# Altium PCB BOARD_4LAYER.PcbDoc (part 12 of 21)
Units mil, origin at the board's own origin, x right, y up, seen from the top; angles counter-clockwise.
Board outline 6692.91 x 10039.37 mil, 4 copper layers (Top Layer, Mid Layer 1, Mid Layer 2, Bottom Layer), stack 66.299 mil thick; 1532 components, 908 nets, 4105 pads, 1286 vias.
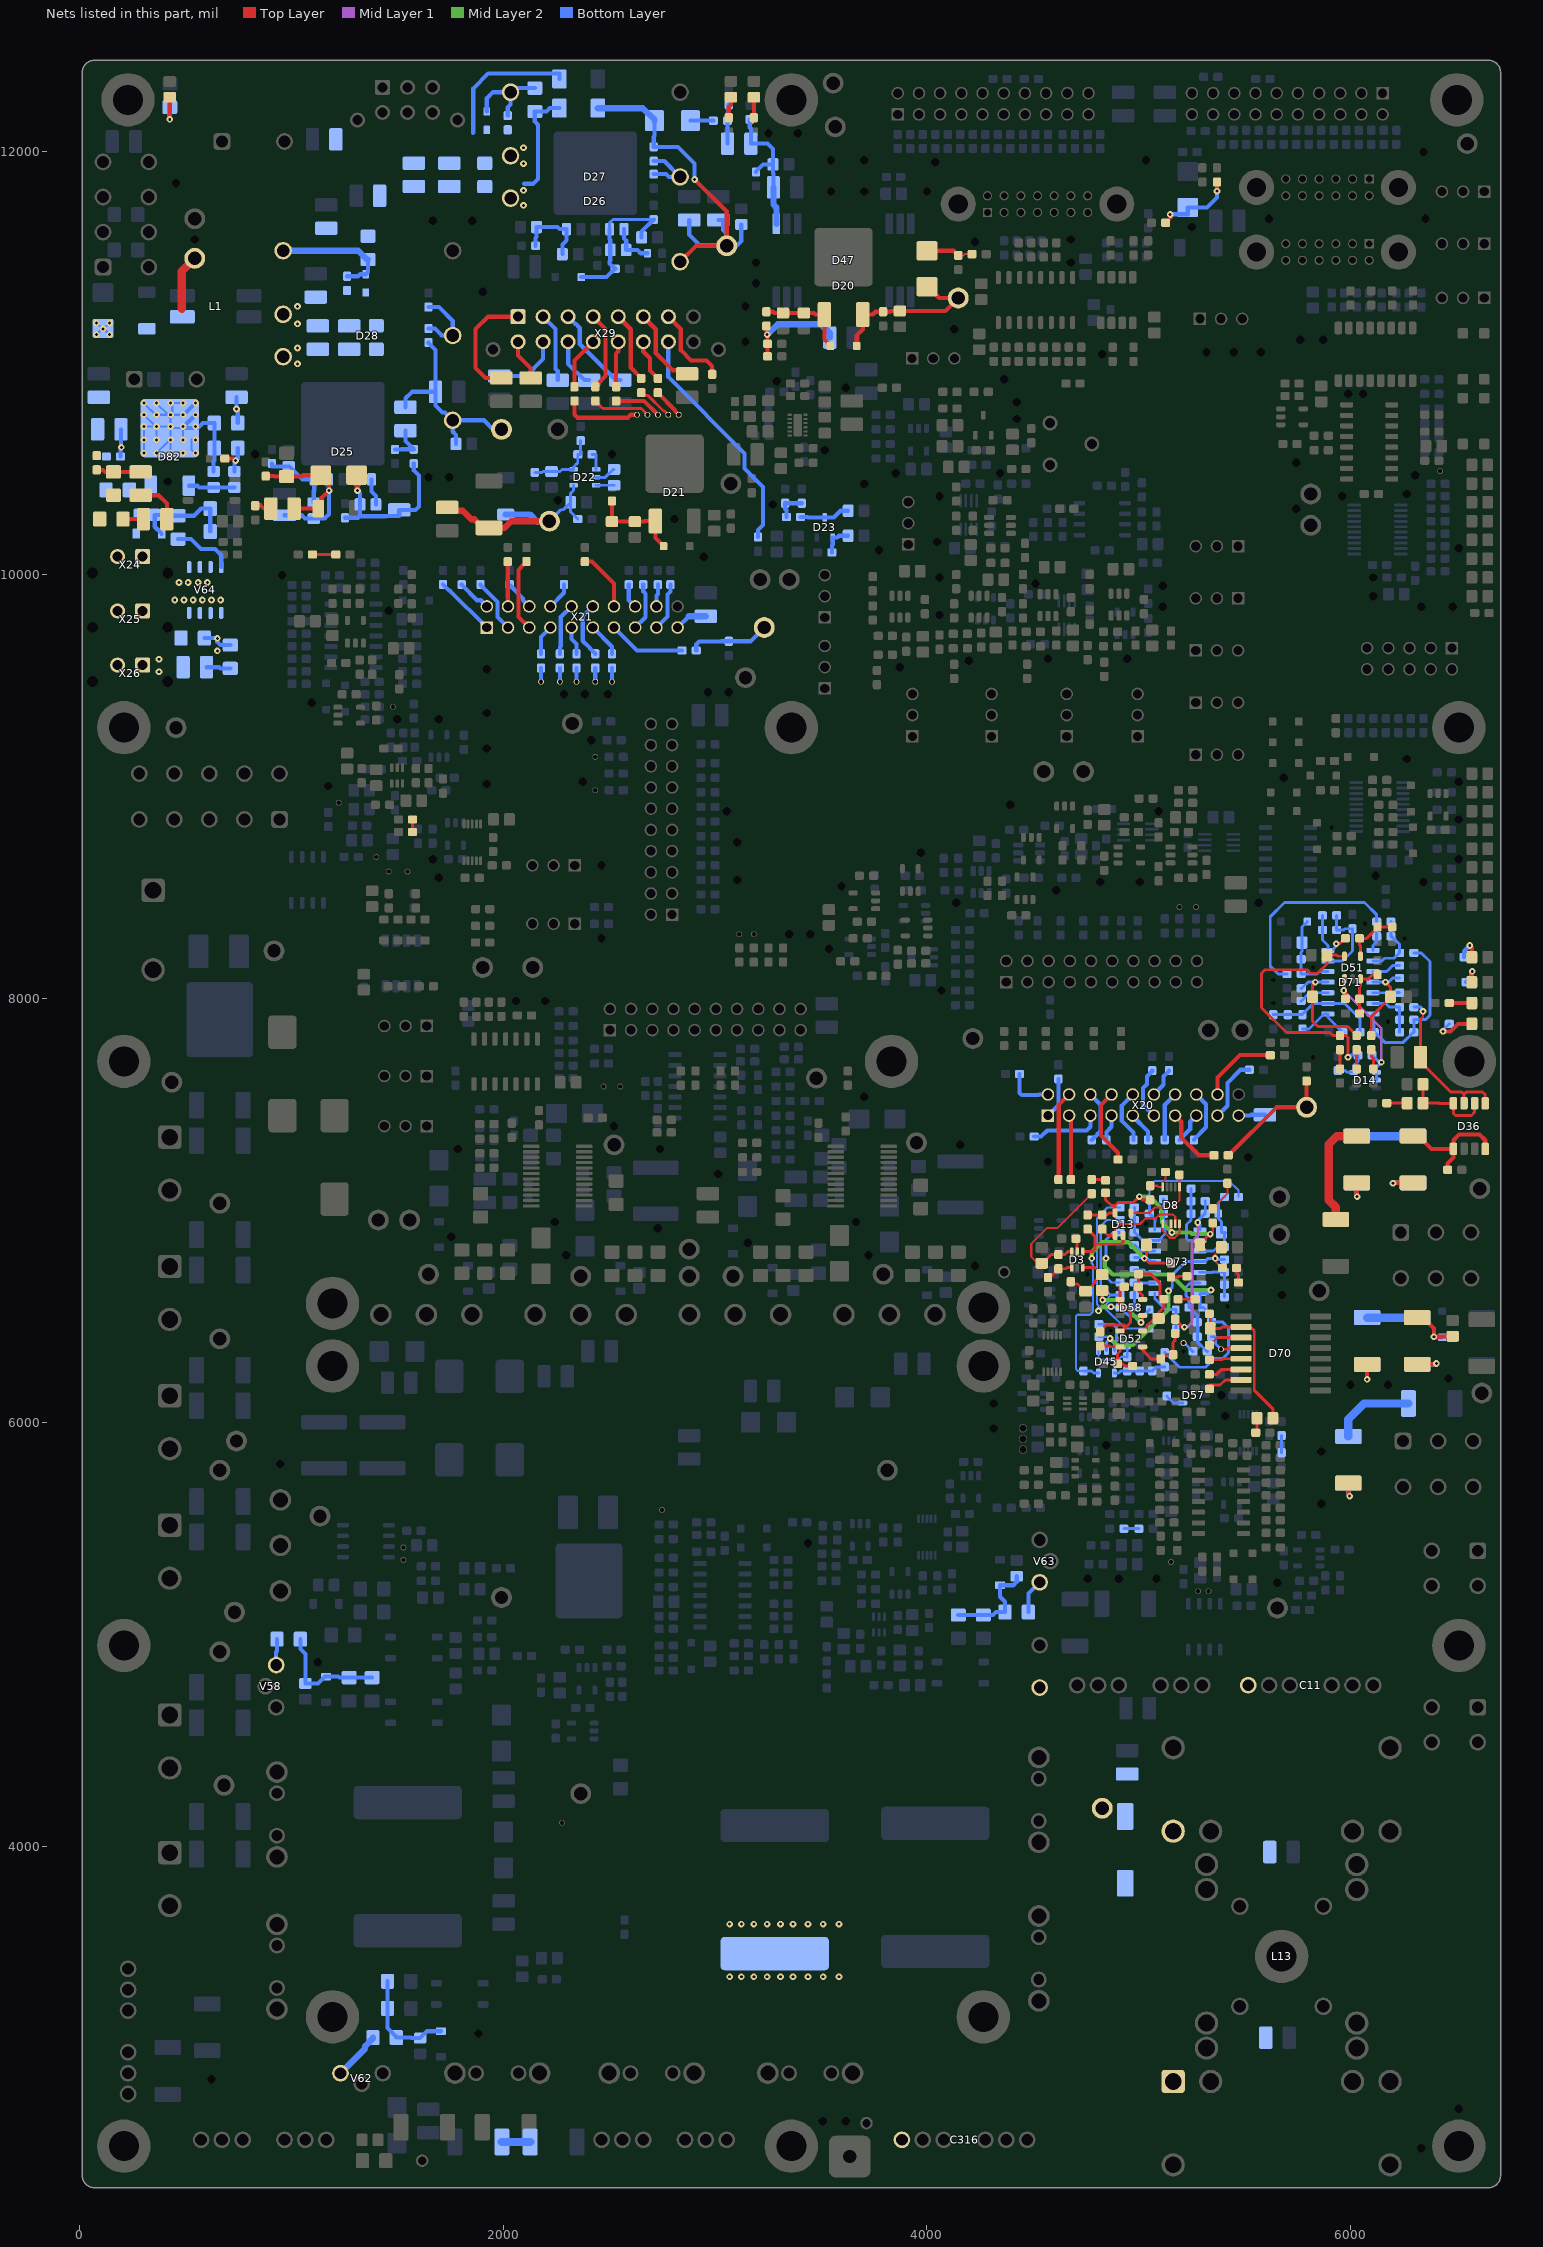
[diagram p14: the nets of this part, all layers, seen from the top]

## Via types
v1: diameter 27.56/31.5/31.5/27.56 (per signal layer), hole 13.78, Top Layer to Bottom Layer, 1270 vias
v2: diameter 59.06, hole 39.37, Top Layer to Bottom Layer, 16 vias

## Nets (pads, with @x,y where several pads share a name; then routed paths per layer and width w, separated by ;. In a path a pad name is that pad's centre, name@x,y a point inside that pad or via, vN(x,y) a via of type N, cw(c..) or ccw(c..) an arc to the next point about the centre after c; other vN are vias at no path point) (continued)
$3N6843: FB10.1 R187.1 | length 80.7
  Bottom Layer w13.78: R187.1@5673.23,5858.27 FB10.1@5673.23,5938.98
$3N6847: FB4.1 R186.1 | length 59.1
  Top Layer w13.78: R186.1@1572.83,8787.4 FB4.1@1572.83,8846.46
$3N6925: D57.4 R68.2 | length 89.8
  Bottom Layer w13.78: R68.2@5131.89,6125.98 5131.89,6124.02 5163.39,6092.52 D57.4@5206.69,6092.52
$3N7024: FB13.2 R184.2 | length 70.9
  Bottom Layer w13.78: FB13.2@4929.13,5500 R184.2@5000,5500
$3N7036: FB7.2 R180.2 | length 110.2
  Top Layer w13.78: R180.2@1100.39,10096.46 FB7.2@1210.63,10096.46
$4N2765: D27.4 R527.1 R561.2 | length 285.5
  Bottom Layer w19.68: R561.2@2710.63,11891.73 2769.02,11891.73 2782.8,11877.95 D27.4@2835.04,11877.95 2760.24,11952.76 R527.1@2710.63,11952.76
$4N2766: H17.1 R576.2 | length 161.4
  Top Layer w19.68: v1(427.17,12149.61) H17.1@427.17,12253.94
  Bottom Layer w19.68: v1(427.17,12149.61) R576.2@427.17,12206.69
$4N2767: D27.6 R526.2 R574.1 V22.1 | length 424.7
  Bottom Layer w19.68: V22.1@1923.23,12187.01 1923.23,12249.28 1951.9,12277.95 D27.6@2035.04,12277.95 ; R526.2@2021.65,12167.32 2021.65,12206.1 2035.04,12219.49 D27.6@2035.04,12277.95 ; R574.1@2149.61,12297.24 2054.33,12297.24 D27.6@2035.04,12277.95
$4N2769: C117.2 C175.1 D20.1 FB61.2 V11.1 | length 438.8
  Top Layer w19.68: FB61.2@3242.13,11242.13 3273.62,11242.13 3279.53,11236.22 C117.2@3320.87,11236.22 C175.1@3419.29,11236.22 3465.47,11236.22 3473.35,11228.35 D20.1@3515.75,11228.35 3515.75,11110.24 3544.29,11081.69 V11.1@3544.29,11080.71
$4N2770: C37.2 C118.2 C259.2 D47.1 L3.2 R267.2 | length 686.8
  Bottom Layer w19.68: R267.2@3163.39,12149.61 3163.39,12111.22 3169.29,12105.32 L3.2@3169.29,12035.43 3247.4,12035.43 3273.62,12009.21 C118.2@3273.62,11937.01 ; C37.2@3192.91,11901.57 3192.91,11903.54 3226.38,11937.01 C118.2@3273.62,11937.01 ; C259.2@3275.59,11828.74 3275.59,11893.7 3273.62,11895.67 C118.2@3273.62,11937.01
  Bottom Layer w29.53: C259.2@3275.59,11828.74 3275.59,11748.23 3289.76,11734.06 D47.1@3289.76,11657.48
$4N2771: C35.2 FB61.1 L5.2 R268.2 | length 505.9
  Top Layer w19.68: FB61.1@3242.13,11175.2 3242.13,11142.64 v1@3246.06,11138.7 ; v1(3246.06,11133.86) v1@3246.06,11138.7 ; R268.2@3248.03,11031.5 C35.2@3248.03,11090.55 3248.03,11136.73 v1@3246.06,11138.7
  Bottom Layer w29.53: v1(3246.06,11133.86) 3295.8,11183.59 3499.48,11183.59 3541.34,11141.73 L5.2@3541.34,11120.08
$4N2773: D22.4 R266.1 | length 90.6
  Bottom Layer w13.78: R266.1@2419.29,10568.9 2438.98,10568.9 D22.4@2438.98,10498.03
$4N2774: C263.2 D22.5 | length 100.1
  Bottom Layer w13.78: D22.5@2438.98,10460.63 2482.28,10460.63 2519.69,10498.03 C263.2@2523.62,10498.03
$4N2775: C263.1 D22.6 | length 84.6
  Bottom Layer w13.78: D22.6@2438.98,10423.23 C263.1@2523.62,10423.23
$4N2778: C42.2 FB64.2 V27.1 | length 399.8
  Top Layer w13.78: FB64.2@5125.98,11661.42 5127.95,11661.42 5153.04,11686.51 5153.04,11695.38 v1(5147.64,11700.79)
  Top Layer w19.68: v1(5368.11,11811.02) C42.2@5368.11,11854.33
  Bottom Layer w19.68: v1(5147.64,11700.79) 5148.61,11701.76 5230.31,11701.76 V27.1@5230.31,11734.25 5321,11734.25 5368.11,11781.36 v1(5368.11,11811.02)
$4N2780: C44.2 FB63.1 V26.1 | length 224
  Top Layer w10: C44.2@4147.64,11507.87 4172.32,11507.87 4178.23,11513.78 FB63.1@4212.6,11513.78
  Top Layer w19.68: V26.1@4000,11529.53 4125.98,11529.53 C44.2@4147.64,11507.87
$4N2782: C38.2 C116.2 D20.3 TP19.1 V11.2 V26.2 | length 813.3
  Top Layer w19.68: V11.2@3668.31,11080.71 3668.31,11129.84 3696.85,11158.39 D20.3@3696.85,11228.35 3744.09,11228.35 3757.87,11242.13 C38.2@3793.31,11242.13 3825.79,11242.13 3829.72,11246.06 C116.2@3872.05,11246.06 4086.61,11246.06 TP19.1@4147.64,11307.09 4070.84,11307.09 4069.88,11306.13 4058.04,11306.13 4003.94,11360.24 V26.2@4000,11360.24
$4N2786: C180.1 D23.1 R188.2 | length 148.6
  Bottom Layer w19.68: R188.2@3551.18,10106.3 3551.18,10139.76 3555.12,10143.7 D23.1@3555.12,10177.17 3576.85,10177.17 3584.72,10185.04 C180.1@3627.95,10185.04
$4N2787: C120.2 D23.3 R189.1 | length 238.3
  Bottom Layer w19.68: R189.1@3403.54,10273.62 3436.1,10273.62 3438.07,10271.65 D23.3@3517.72,10271.65 3559.96,10271.65 3591.46,10303.15 C120.2@3627.95,10303.15
$4N2788: C45.2 FB18.1 R189.2 | length 146.1
  Bottom Layer w19.68: R189.2@3336.61,10273.62 3336.61,10306.02 3330.71,10311.93 FB18.1@3330.71,10338.58 C45.2@3409.45,10338.58
$4N2791: C40.2 C177.1 D22.1 R728.1 R729.2 TP20.1 V31.2 | length 1080.4
  Top Layer w29.53: R728.1@1736.22,10318.9 1736.22,10303.11 1809.69,10303.11 1849.52,10263.28 1864.67,10263.28 1905.51,10222.44 R729.2@1933.07,10222.44 2006.97,10222.44 2038.46,10253.94 TP20.1@2218.5,10253.94
  Bottom Layer w13.78: TP20.1@2218.5,10253.94 2272.15,10307.59 2283.96,10307.59 C177.1@2318.9,10342.52 ; D22.1@2332.68,10423.23 2332.68,10399.11 2318.9,10385.33 C177.1@2318.9,10342.52 ; C40.2@2352.36,10263.78 2318.9,10297.24 C177.1@2318.9,10342.52
  Bottom Layer w29.53: V31.2@2011.81,10285.43 2126.89,10285.43 2158.39,10253.94 TP20.1@2218.5,10253.94
$4N2792: C39.2 C176.1 D22.3 FB62.2 R266.2 | length 346.1
  Bottom Layer w13.78: C39.2@2149.61,10484.25 2183.98,10484.25 2187.91,10488.19 C176.1@2228.35,10488.19 2268.78,10488.19 2278.62,10498.03 D22.3@2332.68,10498.03 2332.68,10509.94 2352.36,10529.62 R266.2@2352.36,10568.9 2365.36,10568.9 2365.36,10600.51 2366.14,10601.3 FB62.2@2366.14,10633.86
$4N2798: C272.2 D25.5 R571.1 R572.2 | length 349.5
  Bottom Layer w19.68: C272.2@909.45,10525.59 909.45,10511.81 R572.2@988.19,10511.81 992.13,10511.81 1053.15,10450.79 D25.5@1108.66,10450.79 1108.66,10398.03 1106.3,10395.67 R571.1@1106.3,10340.55
$4N2801: D25.1 R569.1 | length 126.4
  Bottom Layer w19.68: D25.1@1379.53,10450.79 1379.53,10393.19 1399.61,10373.11 R569.1@1399.61,10332.68
$4N2802: FB72.1 R548.1 | length 80.1
  Top Layer w19.68: FB72.1@830.71,10326.77 832.58,10328.65 856.01,10328.65 871.66,10312.99 R548.1@903.54,10312.99
$4N2803: C52.2 C310.1 D25.4 R548.2 R568.2 R571.2 V40.2 V41.1 | length 996.7
  Top Layer w19.68: C52.2@879.92,10466.54 920.28,10466.54 922.24,10464.57 R568.2@978.35,10464.57 1049.21,10464.57 1055.12,10470.47 V40.2@1139.76,10470.47 1178.03,10470.47 1178.03,10398.75 v1(1179.13,10397.64) 1161.68,10380.18 1159.65,10380.18 1144.7,10365.24 1144.7,10312.99 V41.1@1127.95,10312.99 R548.2@1013.78,10312.99
  Bottom Layer w19.68: C310.1@968.5,10281.5 1050.12,10281.5 1065.87,10265.75 R571.2@1106.3,10265.75 1158.18,10265.75 1179.13,10286.7 v1(1179.13,10397.64) 1176.38,10400.39 D25.4@1176.38,10450.79
$4N2804: D28.4 R529.1 R562.2 | length 339.9
  Bottom Layer w19.68: R529.1@1647.64,11163.39 1678.23,11163.39 1709.96,11131.65 1709.96,11129.92 D28.4@1762.2,11129.92 1762.2,11198.98 1697.41,11263.78 R562.2@1647.64,11263.78
$4N2805: D28.6 R528.2 R575.1 V23.1 | length 582.9
  Bottom Layer w19.68: R528.2@1263.78,11409.45 1315.87,11409.45 1325.71,11419.29 V23.1@1352.36,11419.29 1362.2,11429.13 R575.1@1362.2,11488.19
  Bottom Layer w29.53: D28.6@962.2,11529.92 1316.54,11529.92 1358.27,11488.19 R575.1@1362.2,11488.19
$4N2806: C252.2 C278.2 C279.2 D28.1 L7.2 R575.2
  other v1: 1029.53,10996.06 1029.53,11070.87
$4N2807: C252.1 C278.1 C279.1 D28.2 L8.2 R528.1 V23.2
  other v1: 1029.53,11185.04 1029.53,11267.72
$4N2810: C115.2 C247.1 C260.2 D27.3 L4.1 R527.2 TP18.1 V25.2 | length 1922.5
  Top Layer w19.68: D27.3@2835.04,11477.95 2910.24,11553.15 TP18.1@3055.12,11553.15 3055.12,11714.57 v1(2903.54,11866.14)
  Bottom Layer w19.68: V25.2@2714.57,12143.7 2714.57,12069.88 2710.63,12065.94 R527.2@2710.63,12019.68 2825.97,12019.68 2903.54,11942.12 v1(2903.54,11866.14) ; L4.1@2877.95,11675.2 2877.95,11606.93 2931.73,11553.15 TP18.1@3055.12,11553.15 ; C260.2@3015.75,11675.2 3037.3,11675.2 3037.3,11627.95 3055.12,11610.13 TP18.1@3055.12,11553.15 ; C115.2@3124.02,11653.54 3124.02,11576.43 3100.74,11553.15 TP18.1@3055.12,11553.15
  Bottom Layer w29.53: C247.1@2446.85,12202.76 2659.45,12202.76 2714.57,12147.64 V25.2@2714.57,12143.7
$4N2811: C247.2 C251.2 C276.2 C277.2 D27.1 L2.2 R574.2 | length 522
  Bottom Layer w19.68: 2099.81,11845.58 2141.53,11845.58 2165.05,11869.1 2165.05,12124.32 2149.61,12139.76 R574.2@2149.61,12187.01 2204.65,12187.01 2220.39,12202.76 C247.2@2265.75,12202.76
  other v1: 2096.46,11744.09 2096.46,11814.96
$4N2812: C53.2 C262.2 D25.2 FB73.2 R569.2 V40.1 | length 853.8
  Top Layer w19.68: V40.1@1309.06,10470.47 1309.06,10401.57 v1(1312.99,10397.64)
  Bottom Layer w19.68: C53.2@1253.94,10269.68 1315.94,10269.68 1323.64,10277.39 1324.8,10277.39 ; D25.2@1311.81,10450.79 1311.81,10398.82 v1(1312.99,10397.64) 1324.8,10385.83 R569.2@1324.8,10332.68 1324.8,10277.39 ; FB73.2@1578.74,10525.59 1578.74,10493.03 1603.13,10468.64 1603.13,10323.75 1586.47,10307.09 C262.2@1509.84,10307.09 1509.84,10278.05 1445.79,10278.05 1445.13,10277.39 1324.8,10277.39
$4N2813: C121.2 C261.2 D28.3 L9.1 R529.2 TP22.1 | length 983
  Bottom Layer w19.68: L9.1@1539.37,10791.34 1539.37,10833.74 1569.8,10864.17 C261.2@1681.1,10864.17 ; R529.2@1647.64,11096.46 1647.64,11094.49 1681.1,11061.02 C261.2@1681.1,10864.17 ; C121.2@1777.56,10618.11 1777.56,10660.43 1762.2,10675.79 D28.3@1762.2,10729.92 ; TP22.1@1992.13,10687.01 1953.08,10687.01 1910.16,10729.92 D28.3@1762.2,10729.92 ; C261.2@1681.1,10864.17 1681.1,10800.12 1714.36,10766.86 1725.26,10766.86 D28.3@1762.2,10729.92
$4N2815: C46.2 FB73.1 L9.2 | length 194.1
  Bottom Layer w19.68: C46.2@1490.16,10592.52 1520.75,10592.52 1521.21,10592.98 1548.15,10592.98 1548.61,10592.52 FB73.1@1578.74,10592.52 1578.74,10592.98 1578.28,10592.98 1539.37,10631.89 L9.2@1539.37,10681.1
$4N2816: L1.1 TP21.1 V28.1 V29.1 | length 437.4
  Top Layer w39.37: 484.52,11254.65 484.52,11433.34 TP21.1@545.28,11494.09
  Bottom Layer w10: v1(80.71,11133.86) 98.16,11151.31 98.16,11159.34 102.2,11163.39 V28.1@106.3,11163.39 ; v1(80.71,11188.98) V28.1@106.3,11163.39 ; v1(143.7,11133.86) 126.25,11151.31 126.25,11153.28 118.11,11161.42 v1(112.2,11161.42) V28.1@112.2,11163.39 ; v1(143.7,11188.98) 118.11,11163.39 V28.1@112.2,11163.39 ; V28.1@106.3,11163.39 V28.1@112.2,11163.39
$4N2819: C248.2 C251.1 C276.1 C277.1 D27.2 L6.2 R526.1 V22.2 | length 671.5
  Bottom Layer w19.68: 1857.52,12085.82 1859.38,12087.68 1859.38,12295.73 1929.56,12365.91 2265.75,12365.91 C248.2@2265.75,12340.55
  other v1: 2096.46,11940.94 2096.46,12015.75
$4N2820: FB74.2 V25.1 | length 108.3
  Bottom Layer w19.68: V25.1@2883.86,12143.7 FB74.2@2992.13,12143.7
$4N2821: C41.2 FB74.1 L3.1 | length 185.5
  Bottom Layer w19.68: L3.1@3059.06,12035.43 FB74.1@3059.06,12143.7 3059.06,12177.17 3064.96,12183.07 C41.2@3064.96,12218.5
$4N3984: R680.2 V64.4 | length 291.2
  Bottom Layer w19.68: R680.2@466.54,10169.29 527.83,10169.29 574.61,10122.51 641.43,10122.51 670.08,10093.86 V64.4@670.08,10037.4
$4N3985: R577.2 R578.2 R675.1 R680.1 V47.2 | length 487.6
  Bottom Layer w19.68: V47.2@388.78,10194.88 356.3,10227.36 R675.1@356.3,10283.46 392.8,10283.46 396.73,10279.53 R680.1@466.54,10279.53 542.24,10279.53 575.71,10312.99 R578.2@618.11,10312.99 R577.2@618.11,10204.72
$4N4003: C47.2 C281.2 C325.2 D82.3 L11.2
$4N4004: C254.2 FB76.2 L17.1 | length 210.8
  Top Layer w19.68: FB76.2@82.68,10496.06 112.05,10496.06 121.9,10486.22 C254.2@161.42,10486.22 L17.1@289.37,10486.22
$4N4005: L17.2 R675.2 R706.2 V47.1 V64.1 V64.2 V64.3 X24.1 X25.1 | length 213.6
  Top Layer w19.68: L17.2@289.37,10375.98 374.77,10375.98 413.39,10337.36 R706.2@413.39,10263.78
  other v1: 470.47,9964.57 513.78,9964.57 561.02,9964.57 604.33,9964.57
$4N4008: C253.2 C324.2 D82.4 FB76.1 R709.2 | length 1917.9
  Bottom Layer w10: v1(305.12,10574.8) v1(305.12,10637.8) v1(305.12,10700.79) D82.4@360.24,10700.79 ; v1(305.12,10755.91) D82.4@360.24,10700.79 ; v1(305.12,10811.02) 362.2,10753.94 v1(364.17,10755.91) D82.4@419.29,10755.91 ; v1(364.17,10574.8) 423.23,10633.86 D82.4@427.17,10633.86 ; v1(364.17,10637.8) v1(364.17,10700.79) ; v1(364.17,10811.02) D82.4@419.29,10755.91 ; v1(431.1,10811.02) D82.4@438.98,10811.02 ; D82.4@486.22,10692.91 D82.4@427.17,10692.91 ; v1(490.16,10574.8) v1(431.1,10574.8) 431.1,10629.92 D82.4@427.17,10633.86 ; v1(490.16,10637.8) D82.4@490.16,10692.91 ; D82.4@490.16,10696.85 v1(490.16,10700.79) ; v1(490.16,10811.02) D82.4@438.98,10811.02 ; D82.4@492.13,10753.94 v1(490.16,10755.91) v1(431.1,10755.91) D82.4@427.17,10755.91 ; v1(549.21,10574.8) 544.75,10574.8 529.53,10590.03 529.53,10637.8 v1(549.21,10637.8) ; D82.4@360.24,10700.79 v1(364.17,10700.79) ; v1(364.17,10700.79) 419.29,10700.79 D82.4@427.17,10692.91 ; D82.4@419.29,10755.91 D82.4@427.17,10755.91 ; D82.4@427.17,10633.86 v1(431.1,10637.8) 431.1,10688.98 D82.4@427.17,10692.91 ; D82.4@427.17,10692.91 431.1,10696.85 v1(431.1,10700.79) 431.1,10738.72 427.17,10742.66 D82.4@427.17,10755.91 ; D82.4@427.17,10755.91 438.98,10767.72 D82.4@438.98,10811.02
  Bottom Layer w19.68: D82.4@492.13,10753.94 v1(549.21,10811.02) ; v1(549.21,10700.79) 549.21,10696.41 D82.4@549.21,10692.91 ; v1(549.21,10755.91) 490.16,10696.85 486.22,10692.91 490.16,10692.91 514.84,10692.91 D82.4@549.21,10692.91 ; R709.2@633.86,10488.19 633.86,10536.42 637.8,10540.35 C324.2@637.8,10598.43 C253.2@637.8,10716.54 583.12,10716.54 559.5,10692.91 D82.4@549.21,10692.91
$4N4009: D82.1 R708.2 R709.1 | length 217.8
  Bottom Layer w19.68: D82.1@517.72,10421.26 558.15,10421.26 566.02,10413.39 R709.1@633.86,10413.39 R708.2@732.28,10413.39
$4N4012: C255.1 R705.1 | length 114.7
  Bottom Layer w19.68: R705.1@600.39,9564.96 660.35,9564.96 666.26,9559.06 C255.1@712.6,9559.06
$4N4014: R419.2 R705.2 V64.5 V64.6 V64.7 V64.8 X26.1
  other v1: 375.98,9543.31 375.98,9602.36 450.79,9881.89 494.09,9881.89 537.4,9881.89 580.71,9881.89 624.02,9881.89 667.32,9881.89
$4N4016: C47.1 C253.1 C254.1 C255.2 C256.1 C281.1 C324.1 C325.1 L10.2 R69.2 R419.1 R708.1 X24.2 X25.2 X26.2 | length 572.7
  Top Layer w19.68: R69.2@687.01,10549.21 728.35,10549.21 v1(738.19,10539.37)
  Bottom Layer w19.68: C47.1@194.88,10559.06 194.88,10598.43 v1(198.82,10602.36) 196.85,10604.33 C281.1@196.85,10687.01 ; R419.1@590.55,9702.76 649.61,9702.76 v1(651.57,9700.79) 651.57,9683.98 666.26,9669.29 C255.2@712.6,9669.29 ; R708.1@732.28,10488.19 732.28,10533.46 v1(738.19,10539.37) 748.03,10549.21 C324.1@748.03,10598.43 ; L10.2@742.13,10838.58 v1(742.13,10783.46) 748.03,10777.56 C253.1@748.03,10716.54
  other v1: 651.57,9641.73
$4N4533: C273.2 D26.5 R573.2 R721.1 | length 362.8
  Bottom Layer w19.68: C273.2@2153.54,11553.15 2153.54,11590.55 2157.48,11594.49 R573.2@2157.48,11641.73 2257.2,11641.73 2267.05,11631.89 D26.5@2299.61,11631.89 2299.61,11579.13 2279.53,11559.06 R721.1@2279.53,11513.78
$4N4534: C48.2 C182.1 D26.2 FB75.2 R570.2 V12.1 | length 729.2
  Bottom Layer w13.78: D26.2@2502.76,11631.89 2502.76,11661.47 2518.5,11677.22 2678.15,11677.22 2678.2,11677.17 FB75.2@2710.63,11677.17
  Bottom Layer w19.68: V12.1@2369.09,11405.51 2488.19,11405.51 C48.2@2527.56,11444.88 ; D26.2@2502.76,11631.89 2502.76,11584.25 2505.91,11581.1 R570.2@2505.91,11533.46 2505.91,11483.22 2502.47,11479.78 2502.47,11469.97 C48.2@2527.56,11444.88 ; C48.2@2529.53,11444.88 C48.2@2527.56,11444.88 ; C182.1@2653.54,11592.52 2653.54,11620.08 FB75.2@2710.63,11677.17
$4N4537: D26.1 R570.1 V24.1 | length 209.6
  Bottom Layer w19.68: D26.1@2570.47,11631.89 2570.47,11587.8 2580.71,11577.56 R570.1@2580.71,11533.46 2633.86,11533.46 2649.61,11517.72 V24.1@2681.1,11517.72
$4N4733: C123.2 C181.1 D21.1 FB65.2 V13.1 | length 436
  Top Layer w19.68: FB65.2@2513.78,10348.43 C123.2@2513.78,10251.97 C181.1@2622.05,10251.97 2668.31,10251.97 2670.28,10253.94 D21.1@2718.5,10253.94 2718.5,10175.2 2756.89,10136.81 V13.1@2756.89,10135.83
$4N4831: C256.2 R706.1 | length 96.5
  Top Layer w19.68: C256.2@206.69,10263.78 R706.1@303.15,10263.78
$4N4865: R547.1 X20.19 | length 125.3
  Bottom Layer w19.68: X20.19@5470.87,7448.82 5526.5,7448.82 5530.43,7452.76 R547.1@5594.49,7452.76
$4N4866: R627.1 X20.14 | length 234.4
  Bottom Layer w19.68: R627.1@5122.05,7334.65 5122.05,7500 X20.14@5170.87,7548.82
$4N4867: R143.1 X20.15 | length 147.3
  Bottom Layer w19.68: R143.1@5190.94,7334.65 5242.28,7385.98 5242.28,7420.23 X20.15@5270.87,7448.82
$4N4868: R144.1 X20.16 | length 257.2
  Bottom Layer w19.68: R144.1@5259.84,7334.65 5259.84,7336.61 5317.24,7394.01 5317.24,7502.45 X20.16@5270.87,7548.82
$4N4869: R142.1 X20.17 | length 303.3
  Bottom Layer w19.68: X20.17@5370.87,7448.82 5417.7,7495.65 5417.7,7602.96 5480.09,7665.35 R142.1@5521.65,7665.35
$4N4870: R77.1 X20.18 | length 372.7
  Top Layer w19.68: X20.18@5370.87,7548.82 5370.87,7628.45 5476.67,7734.25 R77.1@5620.08,7734.25
$4N4871: R476.2 X20.11 | length 251.5
  Bottom Layer w19.68: R476.2@5062.99,7661.42 5062.99,7659.45 5037.9,7634.36 5037.9,7596.96 5019.95,7579.01 5019.95,7499.73 X20.11@5070.87,7448.82
$4N4872: R475.2 X20.13 | length 304.6
  Top Layer w19.68: X20.13@5170.87,7448.82 5199.46,7420.23 5199.46,7345.66 5283.31,7261.81 R475.2@5354.33,7261.81
$4N4875: C230.1 R475.1 TP39.1 | length 587.9
  Top Layer w19.68: R475.1@5421.26,7261.81 5423.23,7261.81 5649.61,7488.19 TP39.1@5791.34,7488.19 C230.1@5791.34,7612.2
$4N5149: H18.1 R145.1 | length 100.5
  Top Layer w19.68: R145.1@3064.96,12157.48 3064.96,12207.6 3074.8,12217.44 H18.1@3074.8,12253.94
$4N5151: H19.2 R146.1 | length 106.3
  Top Layer w19.68: R146.1@6464.57,7980.31 H19.2@6570.87,7980.31
$4N5186: H20.1 R147.1 | length 199.3
  Top Layer w19.68: v1(6435.04,7846.46) 6470.47,7846.46 6505.91,7881.89 H20.1@6570.87,7881.89
  Bottom Layer w13.78: v1(6435.04,7846.46) 6435.04,7854.33 6462.6,7881.89 R147.1@6464.57,7881.89
$4N5228: H21.1 R628.2 | length 115.4
  Top Layer w19.68: H21.1@6570.87,8078.74 6570.87,8127.95 v1(6572.83,8129.92)
  Bottom Layer w19.68: R628.2@6543.31,8078.74 6569.61,8105.05 6569.61,8126.7 v1(6572.83,8129.92)
$4N5252: H22.1 R722.2 | length 96.5
  Top Layer w19.68: R722.2@3183.07,12157.48 H22.1@3183.07,12253.94
$4N5407: R551.1 X29.3 | length 414.4
  Bottom Layer w19.68: X29.3@2307.09,11218.5 2339.85,11185.74 2340.77,11185.74 2361.58,11164.93 2361.58,11089.21 2531.5,10919.29 R551.1@2553.15,10919.29
$4N5504: R71.2 X29.12 | length 249.3
  Top Layer w19.68: R71.2@2336.61,10887.8 2336.61,11011.81 X29.12@2425.2,11100.39
$4N5513: R72.2 X29.13 | length 216.7
  Top Layer w19.68: R72.2@2533.46,10887.8 2533.46,11044.21 2543.31,11054.06 X29.13@2543.31,11100.39
$4N5522: R73.2 X29.14 | length 201.8
  Top Layer w19.68: X29.14@2661.42,11100.39 2661.42,11054.06 2693.11,11022.37 2693.11,10964.38 R73.2@2730.32,10927.17
$4N5540: R74.2 X29.4 | length 374.9
  Top Layer w19.68: X29.4@2425.2,11218.5 2483.46,11160.24 2483.46,10938.19 2460.13,10914.85 2460.13,10912.89 R74.2@2435.04,10887.8
$4N5549: R75.2 X29.5 | length 336.2
  Top Layer w19.68: X29.5@2543.31,11218.5 2602.36,11159.45 2602.36,10978.35 2651.57,10929.13 R75.2@2651.57,10927.17
$4N5596: OSC15.1 R74.1 | length 273
  Top Layer w13.78: R74.1@2435.04,10820.87 2470.61,10785.3 2651.71,10785.3 OSC15.1@2681.1,10755.91
$4N5603: OSC16.1 R75.1 | length 178.4
  Top Layer w13.78: R75.1@2651.57,10860.24 2651.57,10847.81 2682.17,10847.81 2756.62,10773.36 2762.07,10773.36 OSC16.1@2779.53,10755.91
$4N5617: OSC17.1 R71.1 | length 371.6
  Top Layer w19.68: R71.1@2336.61,10820.87 2336.61,10756.03 2350.53,10742.11 2588.57,10742.11 2602.36,10755.91 OSC17.1@2631.89,10755.91
$4N5624: OSC18.1 R72.1 | length 223.8
  Top Layer w19.68: R72.1@2533.46,10820.87 2665.35,10820.87 OSC18.1@2730.32,10755.91
$4N5631: OSC19.1 R73.1 | length 145.1
  Top Layer w19.68: R73.1@2730.32,10860.24 2730.32,10858.27 2811.29,10777.3 2811.29,10773.36 OSC19.1@2828.74,10755.91
$4N5717: R555.1 X29.9 | length 195.7
  Top Layer w19.68: X29.9@2070.87,11100.39 2070.87,11035.43 2129.92,10976.38 R555.1@2129.92,10929.13
$4N5718: R70.2 X29.15 | length 1116.1
  Bottom Layer w19.68: X29.15@2779.53,11100.39 2779.53,10934.15 3139.78,10573.9 3139.78,10502.26 3226.37,10415.67 3226.37,10235.31 3202.76,10211.69 R70.2@3202.76,10179.13
$4N5720: R553.1 X29.10 | length 321.3
  Bottom Layer w19.68: R553.1@1982.28,10938.98 2109.1,10938.98 2188.98,11018.86 X29.10@2188.98,11100.39
$4N5724: R554.1 X29.1 | length 550.8
  Top Layer w19.68: R554.1@1992.13,10929.13 1917.33,10929.13 1869.59,10976.87 1869.59,11159.75 1928.35,11218.5 X29.1@2070.87,11218.5
$4N5737: R550.1 X29.2 | length 327.8
  Bottom Layer w19.68: X29.2@2188.98,11218.5 2247.54,11159.94 2247.54,10972.03 2257.87,10961.69 R550.1@2257.87,10919.29
$4N5738: R552.1 X29.11 | length 234.6
  Bottom Layer w19.68: X29.11@2307.09,11100.39 2307.09,10996.06 2383.86,10919.29 R552.1@2405.51,10919.29
$4N5748: R477.2 X20.9 | length 144.2
  Bottom Layer w19.68: X20.9@4970.87,7448.82 4970.87,7445.8 5043.31,7373.36 R477.2@5043.31,7334.65
$4N5749: R474.2 X20.1 | length 193.6
  Bottom Layer w19.68: X20.1@4570.87,7448.82 4620.08,7498.03 R474.2@4620.08,7622.05
$4N5751: R469.2 X20.3 | length 304.7
  Top Layer w19.68: X20.3@4670.87,7448.82 4670.87,7440.4 4679.13,7432.13 4679.13,7229.13 4678.98,7228.97 4678.98,7196.23 4679.13,7196.07 R469.2@4679.13,7147.64
$4N5753: R626.1 X20.5 | length 336.3
  Bottom Layer w19.68: R626.1@4505.91,7350.39 4538.46,7350.39 4567.45,7379.38 4753.55,7379.38 4770.87,7396.7 X20.5@4770.87,7448.82
$4N5755: R470.2 X20.7 | length 124.3
  Bottom Layer w19.68: R470.2@4846.46,7334.65 4846.46,7372.05 4870.87,7396.46 X20.7@4870.87,7448.82
$4N5770: R478.2 X20.2 | length 229
  Bottom Layer w19.68: R478.2@4437.01,7645.67 4437.01,7556.02 4447.26,7545.78 4527.39,7545.78 4530.43,7548.82 X20.2@4570.87,7548.82
$4N5782: R479.2 X20.4 | length 422.2
  Top Layer w19.68: R479.2@4620.08,7147.64 4620.08,7180.2 4621.47,7181.59 4621.47,7499.42 X20.4@4670.87,7548.82
$4N5794: R480.2 X20.6 | length 251.6
  Bottom Layer w19.68: X20.6@4770.87,7548.82 4819.42,7500.27 4819.42,7378.47 4806.07,7365.13 4806.07,7363.16 R480.2@4777.56,7334.65
$4N5806: R481.2 X20.8 | length 361.2
  Top Layer w19.68: X20.8@4870.87,7548.82 4820.42,7498.37 4820.42,7354.96 4901.57,7273.8 R481.2@4901.57,7242.13
$4N5818: R482.2 X20.10 | length 258.3
  Bottom Layer w19.68: X20.10@4970.87,7548.82 4919.37,7497.32 4919.37,7424.19 4974.41,7369.14 R482.2@4974.41,7334.65
$4N5830: R483.2 X20.12 | length 142
  Bottom Layer w19.68: X20.12@5070.87,7548.82 5116.64,7594.59 5116.64,7634.36 5141.73,7659.45 R483.2@5141.73,7661.42
$4N5861: R556.1 X21.19 | length 155.5
  Bottom Layer w19.68: X21.19@2823.23,9751.97 2876.38,9805.12
  Bottom Layer w29.53: 2876.38,9805.12 R556.1@2956.69,9805.12
$4N5862: R629.1 X21.14 | length 287.9
  Top Layer w19.68: R629.1@2385.83,10062.99 2419.91,10062.99 2523.23,9959.67 X21.14@2523.23,9851.97
$4N5863: R149.1 X21.15 | length 227.2
  Bottom Layer w19.68: X21.15@2623.23,9751.97 2671.88,9800.62 2671.88,9911.7 2661.42,9922.17 R149.1@2661.42,9954.72
$4N5864: R150.1 X21.16 | length 115.5
  Bottom Layer w19.68: R150.1@2592.52,9954.72 2592.52,9882.68 X21.16@2623.23,9851.97
$4N5865: R148.1 X21.17 | length 230.2
  Bottom Layer w19.68: X21.17@2723.23,9751.97 2775.46,9804.2 2775.46,9908.25 2789.37,9922.17 R148.1@2789.37,9954.72
$4N5866: R723.1 X21.18 | length 105.7
  Bottom Layer w19.68: X21.18@2723.23,9851.97 2723.23,9903.74 2730.32,9910.83 R723.1@2730.32,9954.72
$4N5867: R486.2 X21.11 | length 161.5
  Bottom Layer w19.68: X21.11@2423.23,9751.97 2513.78,9661.42 R486.2@2513.78,9627.95
$4N5868: R485.2 X21.13 | length 366.1
  Bottom Layer w19.68: X21.13@2523.23,9751.97 2631.5,9643.7 R485.2@2844.49,9643.7
$4N5869: C231.1 R485.1 TP40.1 | length 382.7
  Bottom Layer w19.68: R485.1@2911.42,9643.7 2911.42,9672.75 2925.34,9686.67 3029.19,9686.67 3029.53,9687.01 C231.1@3064.96,9687.01 3167.32,9687.01 TP40.1@3232.28,9751.97
$4N5890: R487.2 X21.9 | length 133.6
  Bottom Layer w19.68: X21.9@2323.23,9751.97 2323.23,9697.64 2346.46,9674.41 R487.2@2346.46,9627.95
$4N5914: R489.2 X21.10 | length 247
  Bottom Layer w19.68: R489.2@2267.72,9627.95 2267.72,9660.51 2272.22,9665.02 2272.22,9800.96 X21.10@2323.23,9851.97
$4N5918: R490.2 X21.12 | length 268.5
  Bottom Layer w19.68: X21.12@2423.23,9851.97 2375.45,9804.19 2375.45,9689.51 2409.95,9655.01 2409.95,9653.04 R490.2@2435.04,9627.95
$4N6207: R468.2 X21.2 | length 161.8
  Bottom Layer w19.68: R468.2@1805.12,9954.72 1805.12,9952.76 1877.32,9880.56 1894.64,9880.56 X21.2@1923.23,9851.97
$4N6208: R467.2 X21.3 | length 256.4
  Bottom Layer w19.68: R467.2@1893.7,9954.72 1893.7,9952.76 1973.23,9873.23 1973.23,9801.97 X21.3@2023.23,9751.97
$4N6209: R471.2 X21.1 | length 290.7
  Bottom Layer w19.68: R471.2@1716.54,9954.72 1744.07,9927.19 1748,9927.19 X21.1@1923.23,9751.97
$4N6211: R473.2 X21.6 | length 140.8
  Bottom Layer w10: R473.2@2031.5,9952.76 R473.2@2031.5,9954.72
  Bottom Layer w19.68: R473.2@2031.5,9952.76 2094.64,9889.61 2094.64,9880.56 X21.6@2123.23,9851.97
$4N6212: R466.2 X21.4 | length 211.7
  Top Layer w19.68: R466.2@2021.65,10062.99 2021.65,9893.98 2023.23,9892.4 X21.4@2023.23,9851.97
$4N6213: R472.2 X21.5 | length 347.3
  Top Layer w19.68: R472.2@2110.24,10062.99 2085.15,10037.9 2085.15,10035.93 2072.89,10023.68 2072.89,9802.31 X21.5@2123.23,9751.97
$4N6217: H23.1 R151.1 | length 125.7
  Top Layer w19.68: v1(6561.02,8251.97) 6570.87,8242.13 H23.1@6570.87,8196.85
  Bottom Layer w19.68: R151.1@6533.46,8196.85 6533.46,8223.66 6537.25,8227.44 6537.25,8228.19 v1(6561.02,8251.97)
$4N6273: R549.1 X29.6 | length 394.2
  Top Layer w19.68: X29.6@2661.42,11218.5 2720.47,11159.45 2720.47,11046.77 2801.66,10965.58 2868.11,10965.58 R549.1@2868.11,10948.82
$4N6274: R76.2 X29.7 | length 399.5
  Top Layer w19.68: X29.7@2779.53,11218.5 2838.58,11159.45 2838.58,11060.65 2887.24,11011.99 2959.32,11011.99 2986.22,10985.09 R76.2@2986.22,10946.85
$4N6322: OSC22.1 R488.1 | length 65
  Bottom Layer w19.68: OSC22.1@2179.13,9496.06 R488.1@2179.13,9561.02
$4N6324: OSC23.1 R489.1 | length 65
  Bottom Layer w19.68: OSC23.1@2267.72,9496.06 R489.1@2267.72,9561.02
$4N6326: OSC24.1 R490.1 | length 65
  Bottom Layer w19.68: OSC24.1@2435.04,9496.06 R490.1@2435.04,9561.02
$4N6328: OSC20.1 R487.1 | length 65
  Bottom Layer w19.68: OSC20.1@2346.46,9496.06 R487.1@2346.46,9561.02
$4N6330: OSC21.1 R486.1 | length 65
  Bottom Layer w19.68: OSC21.1@2513.78,9496.06 R486.1@2513.78,9561.02
$4N6332: R484.2 X21.8 | length 129.3
  Bottom Layer w19.68: X21.8@2223.23,9851.97 2287.4,9916.14 R484.2@2287.4,9954.72
$4N6333: R488.2 X21.7 | length 142.3
  Bottom Layer w19.68: R488.2@2179.13,9627.95 2179.13,9707.87 X21.7@2223.23,9751.97
$5N1550: C97.2 D3.5 | length 63.5
  Top Layer w13.78: C97.2@4702.76,6868.11 4708.66,6862.2 D3.5@4708.66,6807.09
$5N1552: D3.1 R78.2 R269.1 | length 132.9
  Top Layer w13.78: R78.2@4570.87,6685.04 4580.71,6685.04 4620.08,6724.41 R269.1@4620.08,6726.38 4654.53,6726.38 4660.43,6732.28 D3.1@4683.07,6732.28
$5N1553: D3.4 D13.2 R270.1 | length 341
  Top Layer w13.78: D3.4@4734.25,6807.09 4781.01,6807.09 4793.69,6819.76 4793.69,6842.14 ; R270.1@4757.87,6913.39 4793.69,6877.57 4793.69,6842.14 ; D13.2@4925.2,6883.86 4925.2,6851.3 4916.03,6842.14 4793.69,6842.14
$5N1554: D8.9 D13.1 R271.1 | length 452.2
  Top Layer w10: D13.1@4887.8,6883.86 4887.8,6912.13 4913.5,6937.84 5004.95,6937.84 5031.94,6964.83 5080.23,6964.83 5097.45,6982.05 5160.98,6982.05 5171.26,6971.77 D8.9@5171.26,6938.98
  Top Layer w13.78: R271.1@4826.77,6913.39 4826.77,6911.42 4854.33,6883.86 D13.1@4887.8,6883.86
$5N1555: D8.6 D8.10 | length 179.3
  Top Layer w10: D8.6@5112.2,6938.98 5112.2,6905.91 5145.5,6872.62 5169.32,6872.62 5190.94,6894.25 D8.10@5190.94,6938.98
$5N1556: C102.2 D3.3 R152.2 R313.2 | length 316.4
  Top Layer w13.78: R152.2@4679.13,6665.35 4679.13,6654.45 4709.72,6654.45 4744.09,6620.08 C102.2@4748.03,6620.08 4751.97,6620.08 4790.5,6658.61 4790.5,6666.49 4822.83,6698.82 R313.2@4826.77,6698.82 4793.31,6732.28 D3.3@4734.25,6732.28
$5N1558: FB20.1 R190.1 | length 66.6
  Top Layer w13.78: R190.1@4777.56,7147.64 4816.93,7147.64 4820.87,7143.7 FB20.1@4842.52,7143.7
$5N1559: C125.2 D3.6 R190.2 R269.2 | length 670.3
  Top Layer w10: C125.2@4541.34,6751.97 4524.05,6751.97 4492.28,6783.74 4492.28,6843.64 4568.2,6919.57 4616.42,6919.57 R190.2@4777.56,7080.71
  Top Layer w13.78: C125.2@4541.34,6751.97 4545.28,6751.97 4586.61,6793.31 R269.2@4620.08,6793.31 4650.67,6793.31 4664.29,6806.93 4664.29,6807.09 D3.6@4683.07,6807.09
$5N1561: D8.1 D13.4 R83.2 | length 373
  Top Layer w10: D13.4@4962.6,6990.16 5049.69,6990.16 5074.78,7015.24 5157.21,7015.24 5190.94,7048.98 D8.1@5190.94,7112.2 R83.2@5190.94,7169.29
$5N1563: D8.5 R79.2 R272.2 | length 138.1
  Top Layer w10: 5086.22,7118.11 5092.13,7112.2 D8.5@5112.2,7112.2 5112.2,7134.69 5125.98,7148.47 R79.2@5125.98,7183.07
  Top Layer w13.78: R272.2@5053.15,7118.11 5086.22,7118.11
$5N1564: C54.2 C124.2 D8.8 D13.5 R197.2 R270.2 R271.2 R272.1 | length 1067
  Top Layer w10: D8.8@5151.57,6938.98 5151.57,6901.57 v1(5155.51,6897.64) ; 5348.43,6901.57 R197.2@5348.43,6942.91
  Top Layer w13.78: R270.2@4757.87,6980.31 R271.2@4826.77,6980.31 4849.41,6980.31 4859.25,6990.16 D13.5@4887.8,6990.16 4887.8,7024.61 ; C54.2@4842.52,7084.65 4842.52,7052.17 4870.08,7024.61 4887.8,7024.61 ; R272.1@5053.15,7051.18 5017.72,7051.18 v1(5001.97,7066.93) 4973.62,7038.58 4901.77,7038.58 4887.8,7024.61 ; C124.2@5287.4,6838.58 5287.4,6842.52 5334.65,6889.76 v1(5336.61,6889.76) 5348.43,6901.57
  Mid Layer 2 w19.68: v1(5001.97,7066.93) 5051.41,7066.93 5109.1,7009.25 5109.1,6944.05 v1(5155.51,6897.64) 5242.13,6897.64 5250,6889.76 v1(5336.61,6889.76)
$5N2734: D71.3 R80.1 | length 142
  Bottom Layer w13.78: R80.1@5765.75,7990.16 5767.72,7990.16 5806.3,8028.74 D71.3@5891.73,8028.74
$5N2735: C232.1 D71.13 R341.1 R342.2 | length 251.6
  Bottom Layer w13.78: D71.13@6104.33,7978.74 6163.9,7978.74 6182.01,7960.63 R341.1@6230.31,7960.63 R342.2@6230.31,7901.57 C232.1@6230.31,7842.52
$5N2736: D71.12 R82.1 | length 126.3
  Bottom Layer w13.78: D71.12@6104.33,8028.74 6196.97,8028.74 6197.76,8029.53 R82.1@6230.31,8029.53
$5N2737: C235.2 D71.1 R491.2 | length 266
  Bottom Layer w13.78: C235.2@5771.65,7858.27 5802.56,7858.27 5873.03,7928.74 D71.1@5891.73,7928.74 5891.73,7911.42 5960.63,7842.52 R491.2@5962.6,7842.52
$5N2739: C232.2 D71.14 R342.1 R343.2 R398.2 | length 804.7
  Bottom Layer w13.78: D71.14@6104.33,7928.74 6104.33,7892.52 6110.24,7886.61 R343.2@6110.24,7842.52 6112.2,7842.52 6160.01,7794.71 6247.47,7794.71 6295.28,7842.52 C232.2@6297.24,7842.52 R342.1@6297.24,7901.57 6351.83,7901.57 6373.09,7922.84 6373.09,8175.84 6332.4,8216.54 R398.2@6297.24,8216.54
$5N2740: D36.5 D36.7 R341.2 R655.2 | length 760.9
  Top Layer w10: 6328.74,7904.45 6340.55,7916.26 v1(6340.55,7940.94)
  Top Layer w13.78: 6328.74,7904.45 R655.2@6328.74,7724.41 6328.74,7702.76 6471,7560.5 6522.96,7560.5 6534.06,7549.41 ; D36.7@6534.06,7507.09 6534.06,7549.41 ; D36.5@6634.06,7507.09 6634.06,7547.52 6621.6,7559.97 6544.62,7559.97 6534.06,7549.41
  Bottom Layer w13.78: R341.2@6297.24,7960.63 6329.8,7960.63 6340.55,7949.88 v1(6340.55,7940.94)
$5N2741: C234.1 C235.1 D71.2 R343.1 R345.2 | length 526.4
  Bottom Layer w13.78: C234.1@5633.86,7925.2 R345.2@5702.76,7925.2 C235.1@5771.65,7925.2 5771.65,7927.17 5823.23,7978.74 D71.2@5891.73,7978.74 5970.61,7978.74 6043.31,7906.04 R343.1@6043.31,7842.52
$5N2743: R653.2 R654.1 | length 516
  Top Layer w39.37: R654.1@5929.13,6958.66 5929.13,7016.53 5896.36,7049.31 5896.36,7314.03 5934.69,7352.36 R653.2@6027.56,7352.36
$5N2744: R652.2 R653.1 | length 131.6
  Top Layer w19.68: R653.1@6027.56,7131.89 6027.56,7068.9 v1(6029.53,7066.93)
  Bottom Layer w19.68: R652.2@6027.56,7131.89 6027.56,7068.9 v1(6029.53,7066.93)
$5N2745: R651.2 R652.1 | length 265.7
  Bottom Layer w39.37: R652.1@6027.56,7352.36 R651.2@6293.31,7352.36
$5N2746: R650.2 R651.1 | length 190.6
  Top Layer w19.68: v1(6198.82,7129.92) 6200.79,7131.89 R650.2@6293.31,7131.89
  Bottom Layer w19.68: v1(6198.82,7129.92) 6200.79,7131.89 R651.1@6293.31,7131.89
$5N2752: D51.3 R349.2 R658.1 R662.2 | length 253.9
  Top Layer w13.78: R349.2@6041.34,7931.1 R658.1@6041.34,8000 6041.34,8057.99 6045.28,8061.93 D51.3@6045.28,8094.49 6082.94,8094.49 6102.63,8114.17 R662.2@6125.98,8114.17
$5N2753: C296.1 D51.4 R348.2 R530.2 | length 263
  Top Layer w13.78: D51.4@6045.28,8200.79 6045.28,8250.91 6041.34,8254.84 R348.2@6041.34,8285.43 6074.8,8285.43 6125.98,8336.61 R530.2@6125.98,8338.58 C296.1@6194.88,8338.58
$5N2758: FB23.2 R191.2 | length 90.6
  Top Layer w13.78: FB23.2@5948.82,7669.29 R191.2@5948.82,7759.84
$5N2761: FB21.2 R193.2 | length 90.6
  Top Layer w13.78: FB21.2@6027.56,7669.29 R193.2@6027.56,7759.84
$5N2762: FB22.2 R192.2 | length 94.6
  Top Layer w13.78: R192.2@6096.46,7759.84 6096.46,7727.28 6106.3,7717.44 FB22.2@6106.3,7669.29
$5N2763: C56.2 C183.1 D71.11 R192.1 | length 433.4
  Top Layer w13.78: R192.1@6096.46,7826.77 6096.46,7915.35 6187.01,8005.91 C183.1@6187.01,8009.84 6187.01,8055.12 v1(6163.39,8078.74)
  Bottom Layer w13.78: D71.11@6104.33,8078.74 v1(6163.39,8078.74) 6178.07,8078.74 6197.76,8098.43 C56.2@6230.31,8098.43
$5N2764: C236.1 D36.1 D36.4 R650.1 | length 579.6
  Top Layer w19.68: R650.1@6293.31,7352.36 6320.87,7352.36 6381.1,7292.13 D36.1@6484.06,7292.13 ; C236.1@6456.69,7192.91 6456.69,7223.5 6484.06,7250.87 D36.1@6484.06,7292.13 ; D36.4@6634.06,7292.13 6634.06,7332.56 6606.92,7359.69 6511.19,7359.69 6484.06,7332.56 D36.1@6484.06,7292.13
$5N2769: C233.1 D71.9 R397.2 R398.1 | length 307.6
  Bottom Layer w13.78: D71.9@6104.33,8178.74 6145.75,8178.74 6158.45,8191.45 6203.26,8191.45 6228.35,8216.54 R398.1@6230.31,8216.54 6230.31,8255.91 6190.94,8295.28 R397.2@6188.98,8295.28 C233.1@6188.98,8364.17
$5N2770: D71.10 R81.1 | length 137.9
  Bottom Layer w13.78: D71.10@6104.33,8128.74 6169.02,8128.74 6197.76,8157.48 R81.1@6230.31,8157.48
$5N2771: C233.2 D71.8 R347.2 R397.1 | length 1057.1
  Bottom Layer w13.78: R347.2@5698.82,8118.11 5656.02,8118.11 5619.85,8154.28 5619.85,8387.73 5686.93,8454.81 6064.49,8454.81 6122.05,8397.26 C233.2@6122.05,8364.17 R397.1@6122.05,8295.28 6122.05,8269.47 6104.33,8251.76 D71.8@6104.33,8228.74
$5N2772: C313.2 D71.5 R346.2 R347.1 V14.2 | length 388.3
  Bottom Layer w13.78: V14.2@5794.29,8364.17 5794.29,8363.19 5769.69,8338.58 C313.2@5769.69,8265.75 5769.69,8223.43 5765.75,8219.49 R346.2@5765.75,8187.01 R347.1@5765.75,8118.11 5839.69,8118.11 5850.31,8128.74 D71.5@5891.73,8128.74
$5N2773: C216.1 D71.6 R344.2 R672.2 | length 386.9
  Bottom Layer w13.78: D71.6@5891.73,8178.74 5961.2,8178.74 6007.87,8225.42 R344.2@6007.87,8330.71 5973.43,8330.71 5967.52,8324.8 R672.2@5933.07,8324.8 C216.1@5933.07,8393.7
$5N2774: C216.2 D71.7 R348.1 R672.1 | length 287.8
  Top Layer w13.78: v1(5931.1,8259.84) 5946.85,8259.84 5972.44,8285.43 R348.1@5974.41,8285.43
  Bottom Layer w13.78: C216.2@5866.14,8393.7 R672.1@5866.14,8324.8 5866.14,8277.05 5891.73,8251.46 D71.7@5891.73,8228.74 5910.43,8228.74 5931.1,8249.41 v1(5931.1,8259.84)
$5N2777: C185.1 D36.6 D36.8 R566.1 | length 433
  Top Layer w13.78: C185.1@6340.55,7596.46 R566.1@6340.55,7507.87 6415.85,7507.87 6416.63,7507.09 D36.8@6484.06,7507.09 6484.06,7459.23 6493.8,7449.49 6568.78,7449.49 6584.06,7464.76 D36.6@6584.06,7507.09
$5N2802: C57.2 C127.2 D14.5 D51.5 R191.1 R273.2 | length 1407.8
  Top Layer w13.78: D51.5@5970.47,8200.79 5938.98,8200.79 5933.07,8206.69 C127.2@5887.8,8206.69 5887.8,8164.37 5844.33,8120.91 5809.79,8120.91 5794.13,8136.56 5793.6,8137.1 5595.24,8137.1 5578.6,8120.46 5578.6,7958.29 5695.83,7841.07 5902.04,7841.07 5916.34,7826.77 R191.1@5948.82,7826.77 5977.07,7826.77 5986.22,7817.62 v1(5986.22,7724.41)
  Bottom Layer w13.78: C57.2@5938.98,7661.42 5973.35,7661.42 5981.22,7653.54 D14.5@6013.78,7653.54 6013.78,7683.98 6033.46,7703.66 R273.2@6033.46,7734.25 5996.06,7734.25 v1(5986.22,7724.41)
$5N2803: D14.1 D14.2 D51.1 R273.1 R658.2 | length 662.9
  Top Layer w13.78: D51.1@5970.47,8094.49 5970.47,8043.31 v1(5966.54,8039.37) 5974.41,8031.5 R658.2@5974.41,8000
  Mid Layer 1 w10: v1(5966.54,8039.37) 6143.7,7862.2 v1(6143.7,7700.79)
  Bottom Layer w13.78: R273.1@6100.39,7734.25 6133.86,7700.79 v1(6143.7,7700.79) 6120.08,7677.17 D14.1@6120.08,7653.54 D14.2@6120.08,7616.14
$5N4022: R632.2 R633.1 | length 126.9
  Top Layer w19.68: R632.2@5988.19,5714.57 5988.19,5659.45 v1(5994.09,5653.54)
  Bottom Layer w19.68: R633.1@5988.19,5714.57 5988.19,5659.45 v1(5994.09,5653.54)
$5N4024: R633.2 R634.1 | length 395.9
  Bottom Layer w39.37: R633.2@5988.19,5935.04 5988.19,6016.97 6061.77,6090.55 R634.1@6271.65,6090.55
$5N4106: D73.2 R351.1 R352.2 R353.2 | length 215.2
  Bottom Layer w13.78: R352.2@4978.35,6543.31 R353.2@4978.35,6602.36 R351.1@4978.35,6661.42 5010.91,6661.42 5012.48,6659.84 D73.2@5074.8,6659.84
$5N4107: D73.3 R84.1 | length 100.9
  Bottom Layer w13.78: R84.1@4978.35,6720.47 5022.76,6720.47 5033.39,6709.84 D73.3@5074.8,6709.84
$5N4108: D73.5 R85.1 | length 108.4
  Bottom Layer w13.78: R85.1@4978.35,6838.58 4980.31,6838.58 5009.06,6809.84 D73.5@5074.8,6809.84
$5N4109: D73.1 V15.2 V16.1 | length 233.7
  Bottom Layer w13.78: D73.1@5074.8,6609.84 5074.8,6585.85 5127.19,6533.46 V15.2@5174.21,6533.46 V16.1@5174.21,6444.88
$5N4110: R352.1 R532.2 V15.1 | length 851.7
  Mid Layer 2 w19.68: v1(4809.06,6527.56) 4828.74,6547.24 v1(4868.11,6547.24)
  Bottom Layer w10: v1(4809.06,6527.56) 4809.06,6552.24 4802.67,6558.63 4802.67,6966.64 4851.78,7015.75 R532.2@4911.42,7015.75
  Bottom Layer w13.78: v1(4868.11,6547.24) 4872.05,6543.31 R352.1@4911.42,6543.31 4937.84,6516.88 4939.81,6516.88 4953.78,6502.92 5020.63,6502.92 5024.59,6506.87 5024.59,6507.85 V15.1@5050.2,6533.46
$5N4111: C240.1 D73.6 R354.1 R400.1 R401.2 R532.1 | length 459.7
  Bottom Layer w13.78: R532.1@4978.35,7015.75 R354.1@4978.35,6956.69 R400.1@4978.35,6897.64 4980.31,6897.64 5018.11,6859.84 D73.6@5074.8,6859.84 5093.5,6859.84 5123.52,6889.86 5123.52,6948.25 5116.14,6955.63 R401.2@5116.14,6986.22 C240.1@5116.14,7055.12
$5N4112: R353.1 R354.2 V16.2 | length 814.3
  Bottom Layer w10: R354.2@4911.42,6956.69 4848.62,6956.69 4819.8,6927.88 4819.8,6649.75 4867.2,6602.36 4856.99,6592.16 4856.99,6572.01 4842.41,6557.43 4842.41,6537.35 4934.88,6444.88 V16.2@5050.2,6444.88
  Bottom Layer w13.78: 4867.2,6602.36 R353.1@4911.42,6602.36
$5N4113: C237.1 D73.13 R350.1 R360.2 R362.1 | length 420.5
  Bottom Layer w13.78: D73.13@5287.4,6659.84 5242.16,6659.84 5222.52,6640.2 5222.52,6598.74 5236.22,6585.03 R360.2@5236.22,6543.31 5238.19,6543.31 5275.59,6505.91 C237.1@5275.59,6474.41 R350.1@5275.59,6405.51 5275.59,6381.89 5320.87,6336.61 R362.1@5322.83,6336.61
$5N4114: D45.3 R86.1 | length 202.3
  Bottom Layer w13.78: R86.1@4811.02,6464.57 4879.43,6464.57 4893.53,6450.46 4893.53,6384.68 4883.86,6375 D45.3@4883.86,6340.55
$5N4115: C238.2 D45.1 R492.2 | length 235.1
  Bottom Layer w10: D45.1@4809.06,6340.55 4809.06,6307.99 4819.56,6297.49 4903.65,6297.49 4917.19,6311.02 C238.2@4944.88,6311.02
  Bottom Layer w13.78: R492.2@4940.94,6366.14 4944.88,6362.2 C238.2@4944.88,6311.02
$5N4116: C240.2 D73.7 R357.2 R401.1 | length 699.1
  Bottom Layer w10: C240.2@5049.21,7055.12 5049.21,7115.48 5073.72,7139.99 5426.19,7139.99 5470.47,7095.7 R357.2@5470.47,7064.96
  Bottom Layer w13.78: C240.2@5049.21,7055.12 R401.1@5049.21,6986.22 5051.18,6986.22 5076.27,6961.13 5076.27,6947.58 5074.8,6946.11 D73.7@5074.8,6909.84
$5N4117: C217.1 D73.9 R355.2 R670.2 | length 309.8
  Bottom Layer w13.78: R355.2@5246.06,7104.33 C217.1@5246.06,7045.28 R670.2@5246.06,6986.22 5246.06,6955.63 5225.17,6934.73 5225.17,6869.42 5234.74,6859.84 D73.9@5287.4,6859.84
$5N4118: C237.2 D73.14 R351.2 R360.1 R400.2 R666.2 | length 1721.1
  Mid Layer 2 w19.68: v1(4844.49,6775.59) 4839.15,6770.26 4839.15,6736.22 4876.55,6698.82 5149.53,6698.82 5222.37,6625.98 v1(5340.55,6625.98)
  Bottom Layer w10: v1(4844.49,6775.59) 4844.49,6687.82 4870.89,6661.42 R351.2@4911.42,6661.42
  Bottom Layer w13.78: v1(4844.49,6775.59) 4844.49,6863.27 4878.86,6897.64 R400.2@4911.42,6897.64 ; R666.2@5122.05,6330.71 5191.14,6261.62 5314.45,6261.62 5354.92,6302.08 5395.07,6302.08 5423.29,6330.31 5423.29,6446.68 5395.56,6474.41 C237.2@5342.52,6474.41 5342.52,6505.91 5305.12,6543.31 R360.1@5303.15,6543.31 5287.4,6543.31 D73.14@5287.4,6609.84 5328.82,6609.84 5340.55,6621.57 v1(5340.55,6625.98)
$5N4119: C62.2 D73.12 R402.2 R403.2 | length 235
  Bottom Layer w13.78: D73.12@5287.4,6709.84 5317.89,6709.84 5318.37,6709.36 5345.03,6709.36 5346.3,6710.63 R402.2@5403.54,6710.63 C62.2@5403.54,6651.57 R403.2@5403.54,6592.52
$5N4121: C238.1 C239.1 D45.4 R399.2 R666.1 | length 250.4
  Bottom Layer w13.78: D45.4@4883.86,6234.25 4904.45,6234.25 4914.29,6244.09 C238.1@4944.88,6244.09 R399.2@5003.94,6244.09 C239.1@5062.99,6244.09 5082.68,6263.78 R666.1@5122.05,6263.78
$5N4122: C298.1 D52.4 R358.2 R531.2 | length 289.4
  Top Layer w13.78: D52.4@5017.72,6358.27 5017.72,6342.12 5058.65,6301.18 R531.2@5102.36,6301.18 5107.5,6306.32 5116.28,6306.32 5130.83,6320.87 C298.1@5161.42,6320.87 5161.42,6378.86 5171.26,6388.7 R358.2@5171.26,6421.26
$5N4126: C217.2 D73.8 R358.1 R670.1 | length 743.7
  Top Layer w13.78: R358.1@5171.26,6488.19 5171.26,6486.22 5206.69,6450.79 v1(5214.57,6450.79)
  Mid Layer 1 w13.78: v1(5214.57,6450.79) 5228.63,6450.79 5250.15,6472.3 5250.15,6852.67 5277.56,6880.08 v1(5277.56,6944.88)
  Bottom Layer w13.78: D73.8@5287.4,6909.84 5287.4,6935.04 v1(5277.56,6944.88) 5277.56,6952.76 5311.02,6986.22 R670.1@5312.99,6986.22 C217.2@5312.99,7045.28
$5N4127: FB26.2 R194.2 | length 80.7
  Top Layer w13.78: R194.2@5185.04,6582.68 FB26.2@5265.75,6582.68
$5N4128: FB25.2 R196.2 | length 73
  Top Layer w13.78: R196.2@5460.63,6730.31 5460.63,6707.68 5470.47,6697.83 FB25.2@5470.47,6661.42
$5N4129: C314.2 D73.10 R356.2 R357.1 V17.2 | length 401.4
  Bottom Layer w13.78: D73.10@5287.4,6809.84 5352.09,6809.84 5370.98,6828.74 R356.2@5403.54,6828.74 5403.54,6891.73 5409.45,6897.64 C314.2@5389.76,6897.64 5389.76,6947.99 5375,6962.75 V17.2@5375,6986.22 5375,7038.39 5401.57,7064.96 R357.1@5403.54,7064.96
$5N4130: D52.3 R359.2 R361.2 R659.1 | length 256.7
  Top Layer w13.78: R659.1@4816.93,6362.2 4861.22,6362.2 4865.16,6358.27 D52.3@4911.42,6358.27 4911.42,6335.55 4899.61,6323.74 R359.2@4899.61,6277.56 4925.24,6277.56 4935.09,6267.72 R361.2@4970.47,6267.72
$5N4134: C297.1 D70.13 | length 151.5
  Top Layer w13.78: C297.1@5332.68,6297.24 5391.44,6297.24 5395.96,6301.77 D70.13@5482.28,6301.77
$5N4135: D70.12 OSC26.1 R350.2 | length 185.5
  Top Layer w13.78: OSC26.1@5387.8,6346.46 5414.67,6346.46 5419.98,6351.77 D70.12@5482.28,6351.77
  Bottom Layer w13.78: R350.2@5342.52,6405.51 5361.22,6405.51 5361.22,6373.03 OSC26.1@5387.8,6346.46
$5N4138: D70.15 R87.1 | length 177.7
  Top Layer w13.78: R87.1@5332.68,6159.45 5332.68,6177.44 5383.28,6177.44 5407.61,6201.77 D70.15@5482.28,6201.77
$5N4144: D70.14 R88.1 | length 159.3
  Top Layer w13.78: R88.1@5332.68,6228.35 5367.13,6228.35 5390.55,6251.77 D70.14@5482.28,6251.77
$5N4145: D70.11 R89.1 | length 164.4
  Top Layer w13.78: R89.1@5332.68,6366.14 5334.65,6366.14 5370.28,6401.77 D70.11@5482.28,6401.77
$5N4146: FB24.2 R195.2 | length 76.4
  Top Layer w13.78: R195.2@5151.57,6687.01 5186.02,6687.01 5189.96,6690.94 FB24.2@5226.38,6690.94
$5N4150: C59.2 C186.1 C207.2 D45.2 D73.11 R196.1 | length 1080.3
  Top Layer w10: v1(5360.24,6775.59) 5356.3,6771.65 v1@5352.36,6771.65 ; C186.1@5389.76,6828.74 5389.76,6824.8 5352.36,6787.4 v1@5352.36,6771.65 ; R196.1@5393.7,6730.31 5391.73,6730.31 5352.36,6769.69 v1@5352.36,6771.65
  Mid Layer 2 w19.68: v1(4864.17,6397.64) 4895.26,6366.55 4972.85,6366.55 5139.76,6533.47 v1(5139.76,6622.05)
  Bottom Layer w13.78: C207.2@4811.02,6405.51 4856.3,6405.51 v1(4864.17,6397.64) 4846.46,6379.92 D45.2@4846.46,6340.55 ; v1(5139.76,6622.05) 5157.22,6639.5 5157.22,6697.4 5219.66,6759.84 D73.11@5287.4,6759.84 5311.34,6759.84 5327.09,6775.59 v1(5360.24,6775.59) 5356.3,6771.65 5358.27,6769.69 C59.2@5403.54,6769.69
$5N4151: C58.2 C187.1 C206.2 D45.5 D73.4 R195.1 | length 1353.6
  Top Layer w13.78: C187.1@5035.43,6838.58 5035.43,6785.43 v1(5025.59,6775.59) 5047.24,6753.94 R195.1@5151.57,6753.94
  Mid Layer 2 w19.68: v1(4777.56,6775.59) 4777.56,6804.12 4825.01,6851.57 4950.07,6851.57 5006.74,6794.9 5006.74,6794.44 v1(5025.59,6775.59)
  Bottom Layer w10: C206.2@4738.19,6244.09 4712.85,6244.09 4702.8,6254.15 4702.8,6502.23 4709.87,6509.3 4769.2,6509.3 4783.46,6523.56 4783.46,6745 4777.56,6750.91 v1(4777.56,6775.59)
  Bottom Layer w13.78: C206.2@4738.19,6244.09 4776.5,6244.09 4786.34,6234.25 D45.5@4809.06,6234.25 ; C58.2@4978.35,6779.53 v1@5036.42,6779.53 ; v1(5025.59,6775.59) 5032.48,6775.59 v1@5036.42,6779.53 ; D73.4@5074.8,6759.84 5056.1,6759.84 v1@5036.42,6779.53
$5N4153: C61.2 C126.2 D52.5 D58.5 R194.1 R274.2 | length 553.9
  Top Layer w13.78: D52.5@5017.72,6433.07 5037.04,6433.07 5037.04,6455.79 5073.38,6492.13 C126.2@5092.52,6492.13 5092.52,6518.78 5118.11,6544.37 R194.1@5118.11,6582.68 5100.3,6582.68 5100.3,6655.92 5055.43,6700.79 C61.2@4998.03,6700.79 R274.2@4998.03,6641.73 4998.03,6620.56 5017.72,6600.87 D58.5@5017.72,6580.71
$5N4154: D52.1 D58.1 D58.2 R274.1 R659.2 | length 432.6
  Top Layer w13.78: R659.2@4816.93,6429.13 4816.93,6431.1 4847.6,6461.77 4929.66,6461.77 4939.81,6451.62 ; D52.1@4911.42,6433.07 4921.26,6433.07 4939.81,6451.62 ; R274.1@4931.1,6641.73 4911.42,6641.73 D58.1@4911.42,6580.71 D58.2@4911.42,6543.31 4921.95,6543.31 4923.75,6545.11 4934.28,6545.11 4960.67,6518.73 4960.67,6472.48 4939.81,6451.62
$5N4700: D58.4 R313.1 | length 308
  Top Layer w13.78: R313.1@4826.77,6624.02 4826.77,6580.71 v1(4828.74,6578.74) ; v1(5009.84,6472.44) 5017.72,6480.31 D58.4@5017.72,6505.91
  Mid Layer 2 w19.68: v1(4828.74,6578.74) 4903.54,6578.74 v1(5009.84,6472.44)
$5N4714: OSC25.1 R362.2 | length 61.6
  Bottom Layer w13.78: OSC25.1@5210.63,6375.98 5214.57,6375.98 5253.94,6336.61 R362.2@5255.91,6336.61
$5N4744: R126.1 R127.2 | length 184.4
  Top Layer w19.68: R127.2@6312.99,6275.59 6399.61,6275.59 v1(6403.54,6279.53)
  Bottom Layer w19.68: R126.1@6312.99,6275.59 6399.61,6275.59 v1(6403.54,6279.53)
$5N4745: H1.1 R127.1 V18.1 | length 269.3
  Top Layer w19.68: R127.1@6312.99,6496.06 6340.55,6496.06 6391.73,6444.88 v1(6391.73,6405.51) 6421.26,6405.51 6423.23,6407.48 H1.1@6480.31,6407.48
  Bottom Layer w19.68: v1(6391.73,6405.51) 6394.69,6402.56 V18.1@6431.1,6402.56
$5N4828: R128.2 R129.1 | length 141.7
  Top Layer w19.68: v1(6076.77,6204.72) R129.1@6076.77,6275.59
  Bottom Layer w19.68: v1(6076.77,6204.72) R128.2@6076.77,6275.59
$5N4830: R126.2 R128.1 | length 236.2
  Bottom Layer w39.37: R128.1@6076.77,6496.06 R126.2@6312.99,6496.06
$5N4946: FB19.1 R197.1 | length 148.6
  Top Layer w10: R197.1@5348.43,7009.84 5348.43,7011.81 5417.32,7080.71 FB19.1@5417.32,7129.92
$5N4979: FB27.2 R565.2 | length 71.3
  Top Layer w13.78: FB27.2@5551.18,5952.76 5557.09,5958.66 R565.2@5557.09,6021.65
$5N4998: C60.2 C188.1 D70.10 R565.1 | length 737.1
  Top Layer w13.78: C60.2@5332.68,6513.78 5336.61,6509.84 C188.1@5336.61,6444.88 5386.32,6444.88 5393.21,6451.77 D70.10@5482.28,6451.77 5526.65,6451.77 5544.41,6434.01 5544.41,6152.87 5631.89,6065.4 R565.1@5631.89,6021.65
$5N5004: FB28.2 R566.2 | length 96.5
  Top Layer w13.78: FB28.2@6169.29,7507.87 R566.2@6265.75,7507.87
$5N5028: C55.2 C184.1 D71.4 R193.1 | length 564.9
  Top Layer w13.78: v1(5832.68,8078.74) 5818.9,8064.96 C184.1@5818.9,8009.84 5818.9,7894.49 5844.1,7869.29 5985.04,7869.29 R193.1@6027.56,7826.77
  Bottom Layer w13.78: C55.2@5765.75,8049.21 5767.72,8049.21 5797.24,8078.74 v1(5832.68,8078.74) D71.4@5891.73,8078.74
$6N92: R635.1 R636.2 | length 133.9
  Bottom Layer w39.37: R636.2@1994.09,2606.3 R635.1@2127.95,2606.3
$6N94: C5.2 C316.2 L13.1 L14.1
  other v1: 3068.9,3385.83 3124.02,3385.83 3183.07,3385.83 3246.06,3385.83 3309.06,3385.83 3368.11,3385.83 3438.98,3385.83 3509.84,3385.83 3584.65,3385.83 3068.9,3633.86 3124.02,3633.86 3183.07,3633.86 3246.06,3633.86 3309.06,3633.86 3368.11,3633.86 3438.98,3633.86 3509.84,3633.86 3584.65,3633.86
$6N95: R681.2 V58.1 | length 123.3
  Bottom Layer w19.68: V58.1@929.13,4856.69 929.13,4917.52 933.07,4921.46 R681.2@933.07,4978.35
$6N96: R420.1 R421.1 R676.1 R681.1 V48.2 | length 548.9
  Bottom Layer w19.68: R681.1@1043.31,4978.35 1043.31,4932.01 1066.93,4908.39 R676.1@1066.93,4769.69 1126.97,4769.69 1159.45,4802.17 V48.2@1165.35,4802.17 1222.36,4802.17 1227.28,4797.24 R421.1@1273.62,4797.24 R420.1@1381.89,4797.24
$6N97: R682.2 V62.1 | length 230.8
  Bottom Layer w29.53: V62.1@1232.68,2931.1 1348.93,3047.35 1348.93,3057.59 1385.83,3094.49 R682.2@1385.83,3098.43
$6N98: R422.1 R423.1 R677.1 R682.1 V49.2 | length 507.8
  Bottom Layer w19.68: R423.1@1454.72,3364.17 R422.1@1454.72,3236.22 1454.72,3143.7 1496.06,3102.36 R682.1@1496.06,3098.43 1565.87,3098.43 1567.83,3096.46 R677.1@1608.27,3096.46 1640.75,3128.94 V49.2@1706.69,3128.94
$6N99: R683.1 V63.1 | length 162.6
  Bottom Layer w19.68: R683.1@4478.35,5106.3 4478.35,5193.7 V63.1@4531.5,5246.85
$6N100: R424.1 R425.1 R678.1 R683.2 V50.2 | length 474.9
  Bottom Layer w19.68: R424.1@4147.64,5092.52 R425.1@4265.75,5092.52 4312.09,5092.52 4325.71,5106.14 4325.71,5106.3 R683.2@4368.11,5106.3 4368.11,5155.27 4344.49,5178.89 V50.2@4344.49,5233.27 4407.49,5233.27 4423.23,5249.01 R678.1@4423.23,5275.59
$6N101: C4.2 C11.2 FB80.2 L13.4
$6N103: C6.2 FB80.1 TP30.1 V56.1